# Altium PCB PCB_MAGNIS-v1.PcbDoc
Units mm, origin at the board's own origin, x right, y up, seen from the top; angles counter-clockwise.
Board outline 100 x 100 mm, 2 copper layers (Top Layer, Bottom Layer), stack 1.601 mm thick; 50 components, 32 nets, 198 pads, 70 vias.
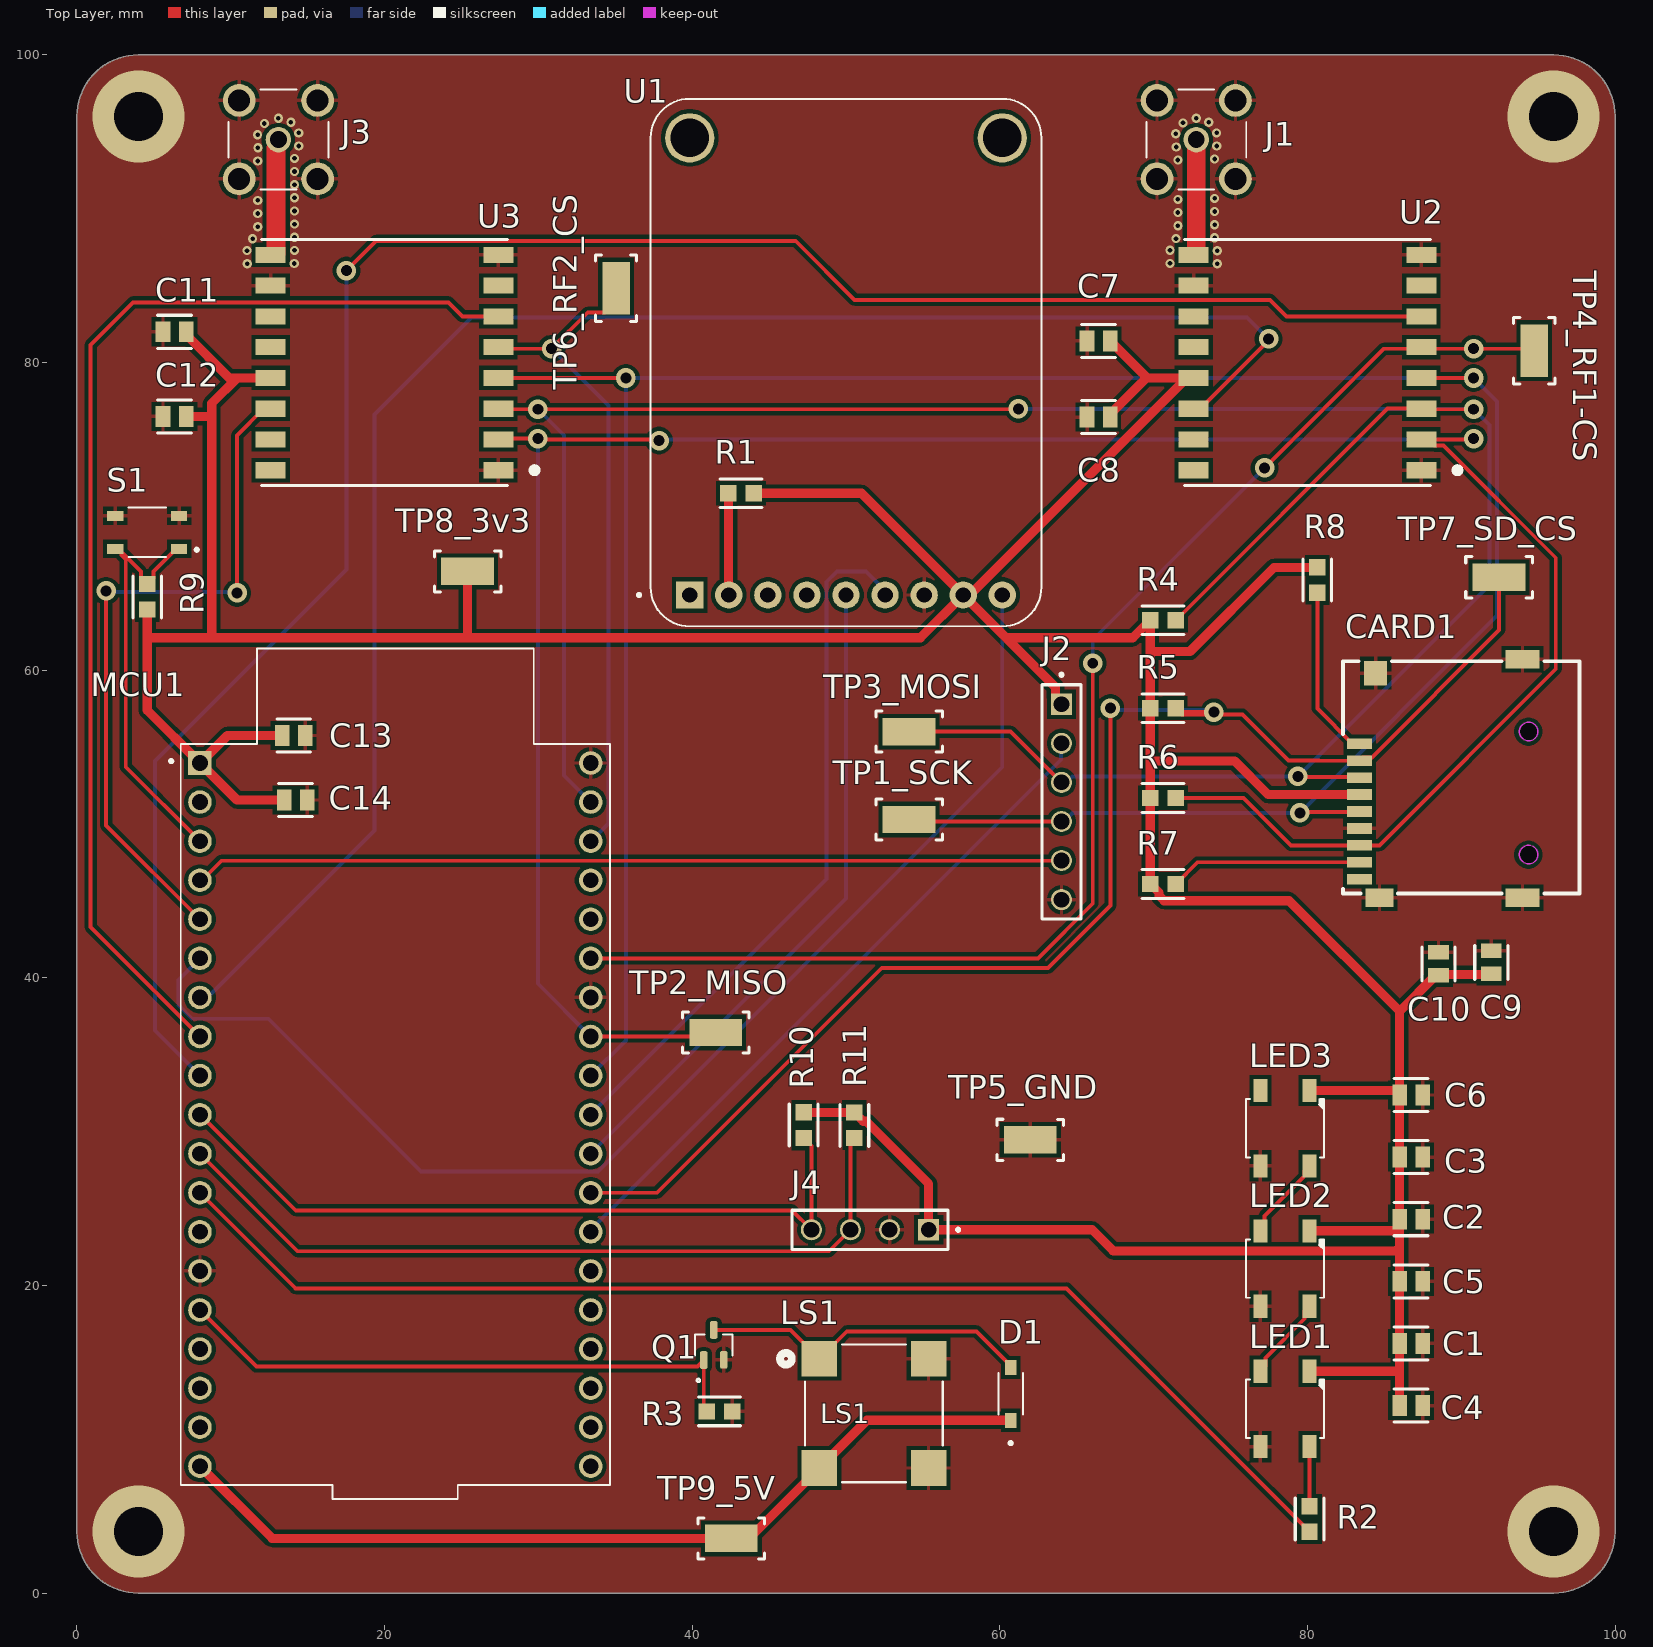
[diagram p0: Top Layer view]
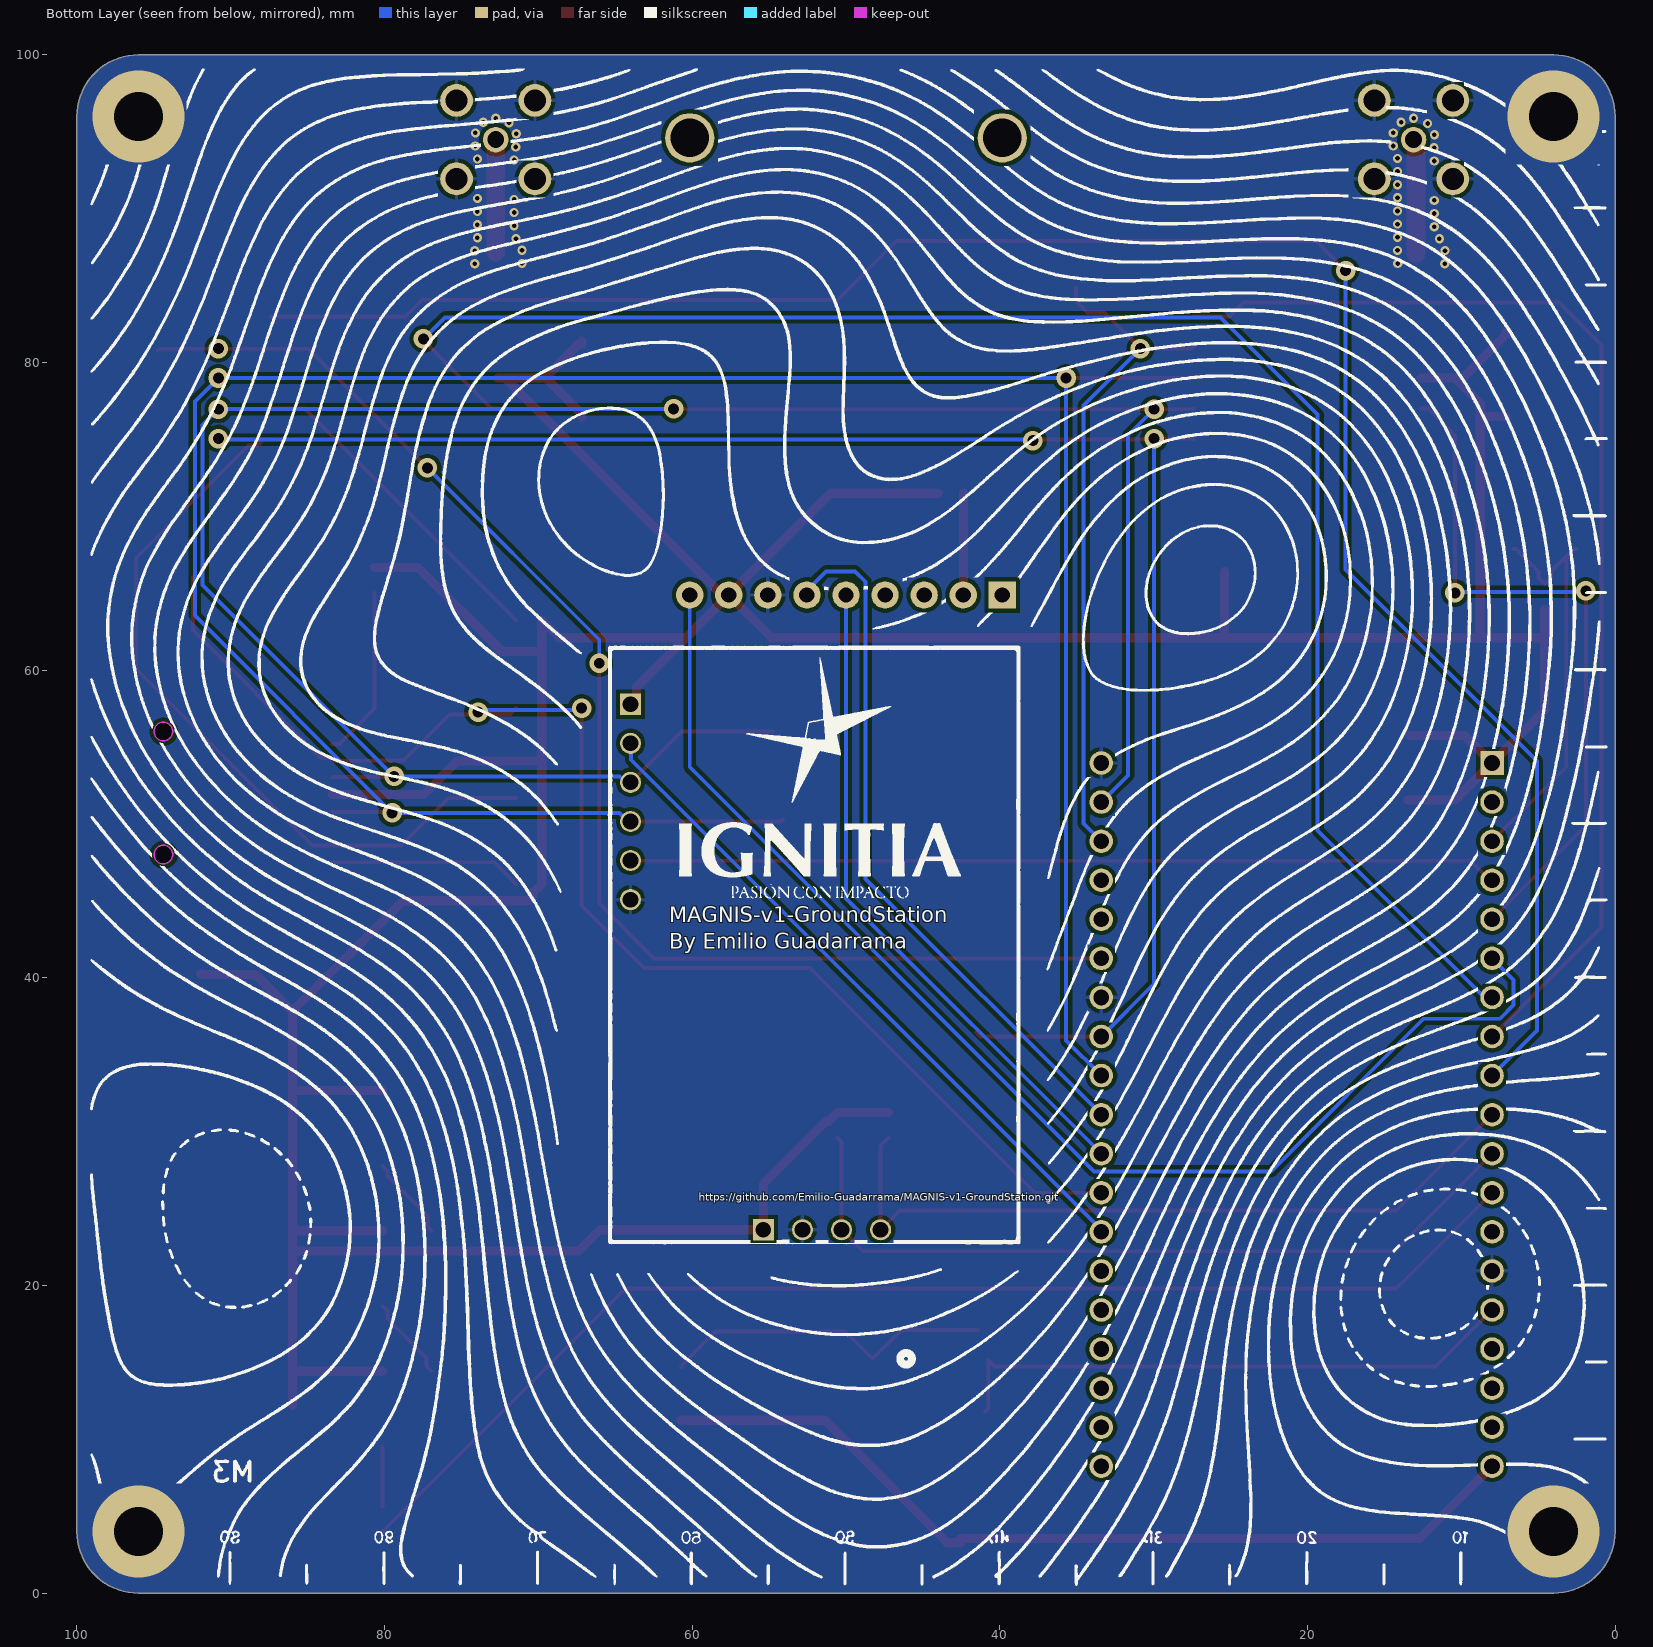
[diagram p1: Bottom Layer view, seen from below]
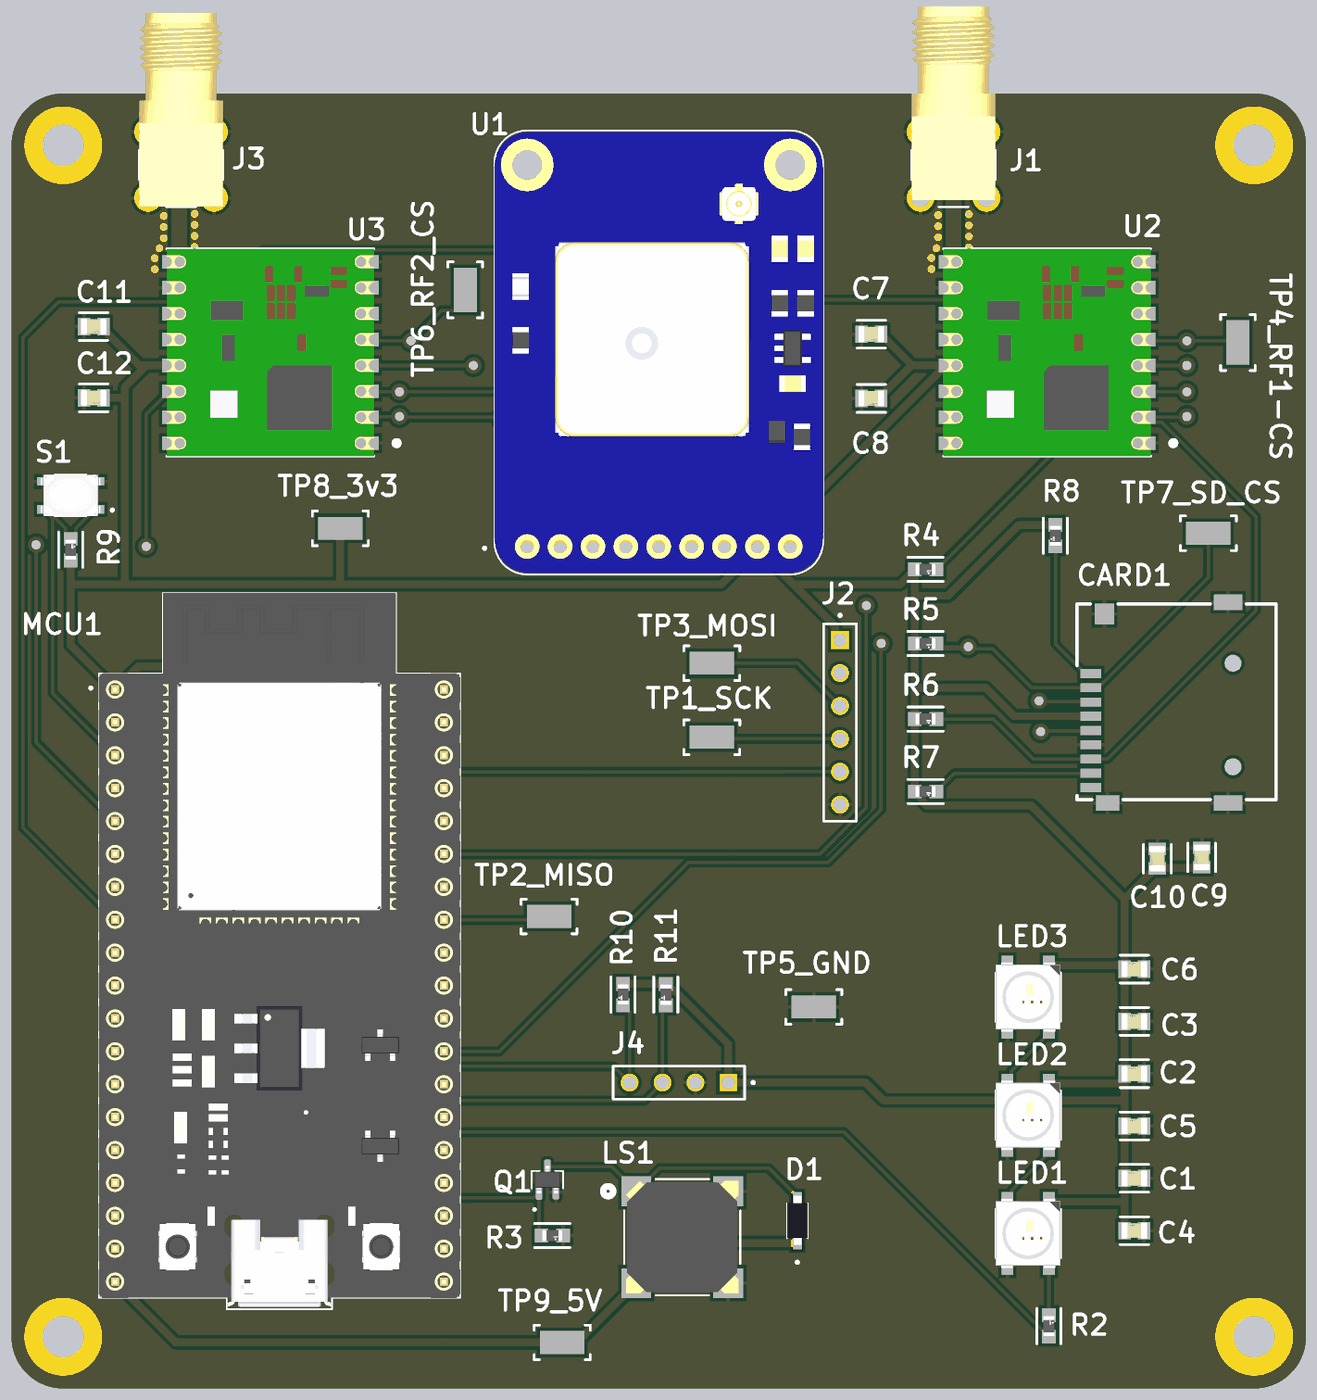
[diagram p2: 3D render of the assembled board from above, using the file's embedded part models]

## Layer stack, top to bottom
Top Solder: solder mask 0.0102, Solder Resist, Dk 3.5
Top Layer: signal copper 0.0356
Dielectric 1: dielectric 1.53, FR-4, Dk 4.5
Bottom Layer: signal copper 0.0356
Bottom Solder: solder mask 0.0102, Solder Resist, Dk 3.5

## Board outline
0,4 0,96 cw(c4,96) 4,100 96,100 cw(c96,96) 100,96 100,4 cw(c96,4) 96,0 4,0 cw(c4,4)

## Design rules (kind name [scope] priority, off if disabled: settings)
Clearance Clearance_1 [InNet('NetJ1_1') Or InNet('NetJ3_1') vs InNet('GND')] p1: gap=0.254 ignorepadtopadclearanceinfootprint=FALSE
Clearance [All] p2: gap=0.254 ignorepadtopadclearanceinfootprint=FALSE
PolygonConnect PolygonConnect_GND_Vias_Direct. [IsVia And InNet('GND')] p1: connectstyle=Direct reliefconductorwidth=0.254 reliefentries=4 polygonreliefangle="90 Angle" airgapwidth=0.254
PolygonConnect [All] p2: connectstyle=Relief reliefconductorwidth=0.254 reliefentries=4 polygonreliefangle="90 Angle" airgapwidth=0.254
RoutingVias [All] p1: holewidth=0.711 width=1.27 viastyle="Through Hole" minholewidth=0.711 minwidth=1.27 maxholewidth=0.711 maxwidth=1.27
SilkToSolderMaskClearance [IsPad] p1: minsilkscreentomaskgap=0.15 clearancetoexposedcopper=TRUE
SolderMaskExpansion [All] p1: expansion=0 istentingtop=FALSE
SupplyNets "Schematic Supply Nets_2" [InNet('VCC_3V3')] p1: voltage=0.000
SupplyNets "Schematic Supply Nets_1" [InNet('VCC_5V')] p2: voltage=0.000
SupplyNets "Schematic Supply Nets" [InNet('GND')] p3: voltage=0.000
Width RF_50Ohm_Width [InNet('NetJ1_1') Or InNet('NetJ3_1')] p1: maxlimit=1.229 minlimit=1.229 preferedwidth=1.229 impedanceprofiledriven=TRUE impedanceprofileid={5FBB7398-2BA2-489B-BA80-AC7F32F7AB72} impedanceprofilevalue=50.000000 minimp=50.000000 maximp=50.000000 favimp=50.000000
Width [All] p2: maxlimit=0.6 minlimit=0.1 preferedwidth=0.254 minimp=50.000000 maximp=50.000000 favimp=50.000000
29 further rules are at their usual default settings.

## Components (designator, comment, footprint, x,y, rotation, side; value= is the part's Value field where it differs from the comment)
C1 "100nF" FP-C0805C-DN-MFG 86.741,16.231 r0 top value="0.10 μF"
C2 "100nF" FP-C0805C-DN-MFG 86.741,24.308 r0 top value="0.10 μF"
C3 "100nF" FP-C0805C-DN-MFG 86.741,28.346 r0 top value="0.10 μF"
C4 "10uF" FP-C0805C-DN-MFG 86.741,12.192 r0 top value="0.10 μF"
C5 "10uF" FP-C0805C-DN-MFG 86.741,20.269 r0 top value="0.10 μF"
C6 "10uF" FP-C0805C-DN-MFG 86.741,32.385 r0 top value="0.10 μF"
C7 "100nF" FP-C0805C-DN-MFG 66.421,81.407 r180 top value="0.10 μF"
C8 "10uF" FP-C0805C-DN-MFG 66.421,76.454 r180 top value="0.10 μF"
C9 "100nF" FP-C0805C-DN-MFG 91.948,41.009 r90 top value="0.10 μF"
C10 "22uF" FP-C0805C-DN-MFG 88.519,40.906 r90 top value="0.10 μF"
C11 "100nF" FP-C0805C-DN-MFG 6.35,82 r180 top value="0.10 μF"
C12 "10uF" FP-C0805C-DN-MFG 6.35,76.5 r180 top value="0.10 μF"
C13 "100nF" FP-C0805C-DN-MFG 14.097,55.753 r0 top value="0.10 μF"
C14 "22uF" FP-C0805C-DN-MFG 14.224,51.562 r0 top value="0.10 μF"
CARD1 "thd2528-11sd-gf" PCBComponent_1 93.047,52.994 r90 top
D1 "1N4148W" SODFL3816X120N 60.706,12.954 r90 top
J1 "BWSMA-KE-Z001" BAT_WIRELESS_BWSMA-KE-Z001 72.771,94.488 r180 top
J2 "TSW-106-07-S-S-LL" SAMTEC_TSW-106-07-S-S-LL 64.008,57.785 r270 top
J3 "BWSMA-KE-Z001" BAT_WIRELESS_BWSMA-KE-Z001 13.1,94.488 r180 top
J4 "TSW-104-07-S-S-LL" SAMTEC_TSW-104-07-S-S-LL 55.372,23.622 r180 top
LED1 "WS2812B" *LED3535 78.537,11.975 r270 top
LED2 "WS2812B" *LED3535 78.537,21.1 r270 top
LED3 "WS2812B" *LED3535 78.537,30.226 r270 top
LS1 "MLT-8530" MLT-8530_JHE 51.816,11.684 r0 top
MCU1 "ESP32-DEVKITC" MODULE_ESP32-DEVKITC 20.701,31.115 r0 top
Q1 "NTS4001NT1G" SOT65P220X100-3N 41.402,16.129 r90 top
R1 "4k7" FP-MCT0603-IPC_A 43.18,71.501 r180 top
R2 "33" FP-MCT0603-IPC_A 80.137,4.826 r90 top
R3 "10k" FP-MCT0603-IPC_A 41.783,11.811 r0 top
R4 "10k" FP-MCT0603-IPC_A 70.612,63.246 r0 top
R5 "10k" FP-MCT0603-IPC_A 70.612,57.531 r0 top
R6 "10k" FP-MCT0603-IPC_A 70.612,51.689 r0 top
R7 "10k" FP-MCT0603-IPC_A 70.612,46.101 r0 top
R8 "10k" FP-MCT0603-IPC_A 80.645,65.853 r270 top
R9 "10k" FP-MCT0603-IPC_A 4.572,64.77 r90 top
R10 "4k7" FP-MCT0603-IPC_A 47.244,30.42 r270 top
R11 "4k7" FP-MCT0603-IPC_A 50.546,30.413 r270 top
S1 "SKRPABE010" SW_SKRPABE010 4.572,68.961 r180 top
TP1_SCK "5015" FP-5015-MFG 54.102,50.292 r0 top (schematic designator TP1)
TP2_MISO "5015" FP-5015-MFG 41.529,36.449 r0 top (schematic designator TP2)
TP3_MOSI "5015" FP-5015-MFG 54.102,56.007 r0 top (schematic designator TP3)
TP4_RF1-CS "5015" FP-5015-MFG 94.742,80.772 r270 top (schematic designator TP4)
TP5_GND "5015" FP-5015-MFG 61.976,29.464 r0 top (schematic designator TP5)
TP6_RF2_CS "5015" FP-5015-MFG 35.052,84.836 r90 top (schematic designator TP6)
TP7_SD_CS "5015" FP-5015-MFG 92.456,66.04 r0 top (schematic designator TP7)
TP8_3v3 "5015" FP-5015-MFG 25.4,66.421 r0 top (schematic designator TP8)
TP9_5V "5015" FP-5015-MFG 42.545,3.556 r0 top (schematic designator TP9)
U1 "746" XCVR_746 50,80 r0 top
U2 "RFM95W" XCVR_RFM95W-868S2 80,80 r180 top
U3 "RFM95W" XCVR_RFM95W-868S2 20,80 r180 top

## Footprints (in the part's own frame and the unit in brackets; to place one, negate y for a bottom-side part, rotate by r counter-clockwise, add the part's x,y. Pads: shape width x height; smd on the part's side, far side on the other; paste and mask are expansions set on the pad)
*LED3535 [mm]
  rect 1.5x0.9 smd: 1(-2.45,1.6) 2(-2.45,-1.6) 3(2.45,-1.6) 4(2.45,1.6)
  silkscreen extent -1.9,-2.54 1.9,2.54, body extent -2.7,-2.5 2.7,2.5, height 1.49
BAT_WIRELESS_BWSMA-KE-Z001 [mm]
  round 1.65 hole 1.1: 1(0,0)
  round 2.13 hole 1.42: 2_1(-2.55,2.55) 2_2(2.55,2.55) 2_3(2.55,-2.55) 2_4(-2.55,-2.55)
  silkscreen extent -3.25,-3.25 3.25,3.25, body extent -3.23,-12.24 3.23,2.72, height 9.75
FP-5015-MFG [mm]
  rect 3.43x1.78 smd paste+0 mask+0: 1(0,0)
  silkscreen extent -2.16,-1.34 2.17,1.34
FP-C0805C-DN-MFG [mm]
  rect 0.95x1.35 smd paste+0 mask+0: 1(-0.75,0) 2(0.75,0)
  silkscreen extent -1.1,-1.07 1.1,1.07, body extent -1.4,-0.85 1.4,0.85, height 0.25
FP-MCT0603-IPC_A [mm]
  rect 1.064x1.062 smd paste+0 mask+0: 1(-0.829,0) 2(0.829,0)
  silkscreen extent -1.36,-0.93 1.36,0.93, body extent -1.86,-1.03 1.86,1.03, height 0.25
MLT-8530_JHE [mm]
  rect 2.311x2.311 smd paste+0 mask+0: 1(-3.55,3.55) 2(-3.55,-3.55) 3(3.55,3.55) 4(3.55,-3.55)
  silkscreen extent -6.1,-4.48 4.48,4.48, body extent -4.35,-4.35 4.35,4.35, height 3
MODULE_ESP32-DEVKITC [mm]
  rect 1.53x1.53 / inner round 1.53 / far side rect 1.53x1.53 hole 1.02: 1(-12.7,22.85)
  round 1.53 hole 1.02: 2(-12.7,20.31) 3(-12.7,17.77) 4(-12.7,15.23) 5(-12.7,12.69) 6(-12.7,10.15) 7(-12.7,7.61) 8(-12.7,5.07) 9(-12.7,2.53) 10(-12.7,-0.01) 11(-12.7,-2.55) 12(-12.7,-5.09) 13(-12.7,-7.63) 14(-12.7,-10.17) 15(-12.7,-12.71) 16(-12.7,-15.25) 17(-12.7,-17.79) 18(-12.7,-20.33) 19(-12.7,-22.87) 20(12.7,-22.87) 21(12.7,-20.33) 22(12.7,-17.79) 23(12.7,-15.25) 24(12.7,-12.71) 25(12.7,-10.17) 26(12.7,-7.63) 27(12.7,-5.09) 28(12.7,-2.55) 29(12.7,-0.01) 30(12.7,2.53) 31(12.7,5.07) 32(12.7,7.61) 33(12.7,10.15) 34(12.7,12.69) 35(12.7,15.23) 36(12.7,17.77) 37(12.7,20.31) 38(12.7,22.85)
  silkscreen extent -14.67,-25 13.95,30.3, body extent -13.97,-24.8 13.97,30.3, height 6.69
PCBComponent_1 [mm]
  rect 0.7x1.6 smd: 1(2.218,9.667) 2(1.118,9.667) 3(0.018,9.667) 4(-1.082,9.667) 5(-2.182,9.667) 6(-3.282,9.667) 7(-4.382,9.667) 8(-5.482,9.667) 9(-6.582,9.667)
  rect 1.2x1.8 smd: 10(-7.782,8.367)
  rect 1.2x2.2 smd: 11(-7.782,-0.933) 12(7.718,-0.933)
  rect 1.6x1.5 smd: 13(6.818,8.616)
  Keep-Out Layer board cut-out: -4.382,-1.333 -4.441,-1.594 -4.608,-1.803 -4.848,-1.918 -5.115,-1.918 -5.356,-1.803 -5.522,-1.594 -5.582,-1.333 -5.582,-1.333 -5.522,-1.073 -5.356,-0.864 -5.115,-0.749 -4.848,-0.749 -4.608,-0.864 -4.441,-1.073 -4.382,-1.333
  Keep-Out Layer board cut-out: 3.618,-1.333 3.559,-1.594 3.392,-1.803 3.152,-1.918 2.885,-1.918 2.644,-1.803 2.477,-1.594 2.418,-1.333 2.418,-1.333 2.477,-1.073 2.644,-0.864 2.885,-0.749 3.152,-0.749 3.392,-0.864 3.559,-1.073 3.618,-1.333
  Keep-Out Layer circle w0.003: c-4.982,-1.333 r0.6
  Keep-Out Layer circle w0.003: c3.018,-1.333 r0.6
  Keep-Out Layer region: -4.382,-1.333 -4.441,-1.594 -4.608,-1.803 -4.848,-1.918 -5.115,-1.918 -5.356,-1.803 -5.522,-1.594 -5.582,-1.333 -5.582,-1.333 -5.522,-1.073 -5.356,-0.864 -5.115,-0.749 -4.848,-0.749 -4.608,-0.864 -4.441,-1.073 -4.382,-1.333
  Keep-Out Layer region: 3.618,-1.333 3.559,-1.594 3.392,-1.803 3.152,-1.918 2.885,-1.918 2.644,-1.803 2.477,-1.594 2.418,-1.333 2.418,-1.333 2.477,-1.073 2.644,-0.864 2.885,-0.749 3.152,-0.749 3.392,-0.864 3.559,-1.073 3.618,-1.333
  Keep-Out Layer region: -4.382,-1.333 -4.391,-1.438 -4.418,-1.539 -4.462,-1.633 -4.522,-1.719 -4.596,-1.793 -4.682,-1.853 -4.777,-1.897 -4.878,-1.924 -4.982,-1.933 -5.086,-1.924 -5.187,-1.897 -5.282,-1.853 -5.368,-1.793 -5.442,-1.719 -5.502,-1.633 -5.546,-1.539 -5.573,-1.438 -5.582,-1.333 -5.573,-1.229 -5.546,-1.128 -5.502,-1.033 -5.442,-0.948 -5.368,-0.874 -5.282,-0.814 -5.187,-0.77 -5.086,-0.743 -4.982,-0.733 -4.878,-0.743 -4.777,-0.77 -4.682,-0.814 -4.596,-0.874 -4.522,-0.948 -4.462,-1.033 -4.418,-1.128 -4.391,-1.229 -4.382,-1.333
  Keep-Out Layer region: 3.618,-1.333 3.609,-1.438 3.582,-1.539 3.538,-1.633 3.478,-1.719 3.404,-1.793 3.318,-1.853 3.223,-1.897 3.122,-1.924 3.018,-1.933 2.914,-1.924 2.813,-1.897 2.718,-1.853 2.632,-1.793 2.558,-1.719 2.498,-1.633 2.454,-1.539 2.427,-1.438 2.418,-1.333 2.427,-1.229 2.454,-1.128 2.498,-1.033 2.558,-0.948 2.632,-0.874 2.718,-0.814 2.813,-0.77 2.914,-0.743 3.018,-0.733 3.122,-0.743 3.223,-0.77 3.318,-0.814 3.404,-0.874 3.478,-0.948 3.538,-1.033 3.582,-1.128 3.609,-1.229 3.618,-1.333
  silkscreen extent -7.53,-4.64 7.59,10.73
SAMTEC_TSW-104-07-S-S-LL [mm]
  rect 1.37x1.37 hole 1.02: 01(0,0)
  round 1.37 hole 1.02: 02(2.54,0) 03(5.08,0) 04(7.62,0)
  silkscreen extent -2.02,-1.27 8.89,1.27
SAMTEC_TSW-106-07-S-S-LL [mm]
  rect 1.37x1.37 hole 1.02: 01(0,0)
  round 1.37 hole 1.02: 02(2.54,0) 03(5.08,0) 04(7.62,0) 05(10.16,0) 06(12.7,0)
  silkscreen extent -2.02,-1.27 13.97,1.27
SODFL3816X120N [mm]
  rect 0.97x0.73 smd paste+0 mask+0.102: A(1.72,0) C(-1.72,0)
  silkscreen extent -3.3,-0.8 1.35,0.8, body extent -1.87,-0.81 1.93,0.79, height 1.1
SOT65P220X100-3N [mm]
  rrect50% 1.15x0.5 smd: 1(-0.98,0.65) 2(-0.96,-0.65) 3(0.98,0)
  silkscreen extent -2.4,-1.21 0.68,1.21, body extent -1.05,-1 1.05,1, height 1.1
SW_SKRPABE010 [mm]
  rect 1.05x0.65 smd: 1(-2.075,1.075) 2(2.075,1.075) 3(-2.075,-1.075) 4(2.075,-1.075)
  silkscreen extent -3.32,-1.6 1.23,1.6, body extent -2.3,-1.6 2.3,1.6, height 2.5
XCVR_746 [mil]
  rect 70x70 / inner round 70 / far side rect 70x70 hole 39.37 mask+4.02: 1(-400,-595)
  round 70 hole 39.37 mask+4.02: 2(-300,-595) 3(-200,-595) 4(-100,-595) 5(0,-595) 6(100,-595) 7(200,-595) 8(300,-595) 9(400,-595)
  round 125.98 hole 98.43 mask+4.02: SH1(-400,575) SH2(400,575)
  silkscreen extent -533,-675 500,675, body extent -500,-670 500,670, height 256
XCVR_RFM95W-868S2 [mm]
  rect 1.95x1.05 smd: 1(-7.4,7) 2(-7.4,5) 3(-7.4,3) 4(-7.4,1) 5(-7.4,-1) 6(-7.4,-3) 7(-7.4,-5) 8(-7.4,-7) 9(7.4,-7) 10(7.4,-5) 11(7.4,-3) 12(7.4,-1) 13(7.4,1) 14(7.4,3) 15(7.4,5) 16(7.4,7)
  silkscreen extent -10.04,-8 8,8, body extent -8,-8 8,8, height 1.8

## Part data
C1 C2 C3 C4 C5 C6 C7 C8 C9 C10 C11 C12 C13 C14: library part CMP-2007-00279-2, "CAP CER 0.1UF 50V X7R 0805", Capacitance="0.10 μF", Manufacturer=KEMET, Manufacturer Part Number=C0805C104K5RACTU, Package=C0805C-DN, Temperature="-55°C to +125°C", Temperature Characteristic=X7R, Temperature Coefficient=30ppm/°C, Temperature Range High=+125°C, Temperature Range Low=-55°C, Tolerance=0.1, Voltage Rating="50 V", Automotive=No, Category=Cap, ComponentLink2Description=Datasheet, ComponentLink2URL=https://content.kemet.com/datasheets/KEM_C1003_C0G_SMD.pdf, Device Class L1="Passive Components", Device Class L2=Capacitors, Device Class L3="Ceramic Capacitors", Digikey Description="CAP CER 0.1UF 50V X7R 0805", Height=0.88mm, Ipc Land Pattern Name=CAPC200125X78, Lead Free=Yes, Material=Ceramic, Mouser Description="Cap Ceramic 0.1uF 50V X7R 10% SMD 2.0 x 1.2 mm 125 C Paper T/R", Octopart=https://octopart.com/c0805c104k5ractu-kemet-143926, RoHS=TRUE
CARD1: "Card Connection Mode:Push-Push Card Type:MicroSD Card (TF Card) Connector Type:Connector and Ejector Additional Card Detection Pins:No Height Above Board:2mm Operating Temperature:- Operating Temperature:-", JLCPCB Part Class="Extended Part", LCSC Part Name="自弹式 MicroSD卡(TF卡) 卡座", Manufacturer=THD(台华达), Manufacturer Part=THD2528-11SD-GF, Operating Temperature=-, AddInBom=yes, Additional Card Detection Pins=No, Card Connection Mode=Push-Push, Card Type="MicroSD Card (TF Card)", Connector Type="Connector and Ejector", ConvertToPcb=yes, Datasheet=https://item.szlcsc.com/datasheet/THD2528-11SD-GF/268992.html, FootprintName=TF-SMD_THD2528-11SD-GF, Height Above Board=2mm, ModelId=1386afa97a0040b3a0d9dc55a27a422f, ModelName=TF-SMD_THD2528-11SD-GF, ModelTransform=635.826,598.424,0,0,0,0,0,-82.677,-23.622, Supplier=LCSC, Supplier Footprint=SMD, Supplier Part=C283232, Symbol=THD2528-11SD-GF
D1: "Small Signal Diode, SOD-123F, 100V, 0.15A, 150Â°C", Package="SOD-123F Diotec", Check_prices=https://www.snapeda.com/parts/1N4148W/Diotec/view-part/?ref=eda, MF="Diotec Semiconductor", MP=1N4148W, SnapEDA_Link=https://www.snapeda.com/parts/1N4148W/Diotec/view-part/?ref=snap
J1 J3: "1 Inner bore SMA Board Edge Positive foot -65â„ƒ~+165â„ƒ 50Î© Plugin RF Connectors / Coaxial Connectors ROHS", Package=None, Check_prices=https://www.snapeda.com/parts/BWSMA-KE-Z001/Bat+Wireless/view-part/?ref=eda, MF="Bat Wireless", MP=BWSMA-KE-Z001, SnapEDA_Link=https://www.snapeda.com/parts/BWSMA-KE-Z001/Bat+Wireless/view-part/?ref=snap
J2 J4: Package=None, Availability=Unavailable, Price=None
  J2: MP=TSW-106-07-S-S-LL
  J4: MP=TSW-104-07-S-S-LL
LED1 LED2 LED3: "Intelligent control LED integrated light source", Package=None, Check_prices=https://www.snapeda.com/parts/WS2812B/Worldsemi/view-part/?ref=eda, MF=Worldsemi, MP=WS2812B, SnapEDA_Link=https://www.snapeda.com/parts/WS2812B/Worldsemi/view-part/?ref=snap
LS1: "Description", Manufacturer_Name="Jiangsu Huaneng Elec", Copyright="Copyright (C) 2025 Ultra Librarian. All rights reserved.", Manufacturer_Part_Number=MLT-8530, RefDes=RefDes, Type=Type
MCU1: "ESP32-WROOM-32UE series Transceiver; 802.11 b/g/n (Wi-Fi, WiFi, WLAN), Bluetooth Â® Smart Ready 4.x Dual Mode Evaluation Board", Package=None, Check_prices=https://www.snapeda.com/parts/ESP32-DEVKITC/Espressif+Systems/view-part/?ref=eda, MF="Espressif Systems", MP=ESP32-DEVKITC, SnapEDA_Link=https://www.snapeda.com/parts/ESP32-DEVKITC/Espressif+Systems/view-part/?ref=snap
Q1: "N-Channel 30V 270mA _Ta_ 330mW _Ta_ Surface Mount SC-70-3 _SOT323_", Package="SC-70 ON Semiconductor", Availability=Unavailable, MF="ON Semiconductor", MP=NTS4001NT1G, Price=None, SnapEDA_Link=https://www.snapeda.com/parts/NTS4001NT1G/ON%20Semiconductor/view-part/274588/?ref=snap
R1 R2 R3 R4 R5 R6 R7 R8 R9 R10 R11: library part CMP-02407-011165-1, "RES SMD 100 OHM 1% 1/8W 0603", Case Code (Imperial)=0603, Case Code (Metric)=1608, Max Operating Temperature=155°C, Max Power Dissipation=125mW, Min Operating Temperature=-55°C, Package Quantity=1000, Resistance=20kR, Resistor Type="Thin Film", Temperature Coefficient=25ppm/°C, Tolerance=0.1%, Voltage Rating=75V, Case/Package=0603, Construction=Rectangular, Depth=0.85mm, Features="Automotive AEC-Q200", Height=0.022inch, Length=1.55mm, Military Standard=Not, Number of Terminations=2, Packaging="Tape and Reel", Power Rating=125mW, Series="MCT 0603 - Precision", Termination=SMD/SMT, Weight=6.7E-05oz, Width=0.033inch
S1: "Switch Tactile N.O. SPST Button J-Bend 0.05A 16VDC 1.57N SMD Automotive T/R", Package=None, Check_prices=https://www.snapeda.com/parts/SKRPABE010/ALPS/view-part/?ref=eda, MF=ALPS, MP=SKRPABE010, SnapEDA_Link=https://www.snapeda.com/parts/SKRPABE010/ALPS/view-part/?ref=snap
TP1_SCK TP2_MISO TP3_MOSI TP4_RF1-CS TP5_GND TP6_RF2_CS TP7_SD_CS TP8_3v3 TP9_5V: library part CMP-2000-05183-2, "PC TEST POINT MINIATURE", Manufacturer=keystone, Automotive=No, Category=Conn, ComponentLink2Description=Datasheet, ComponentLink2URL=http://www.keyelco.com/product-pdf.cfm?p=1353, Conn Orientation=Straight, Contact Material=Silver, Device Class L1=Connectors, Device Class L2=unset, Device Class L3=unset, Digikey Description="PC TEST POINT MINIATURE", Height=1.65mm, Lead Free=Yes, Manufacturer Part Number=5015, Number Of Contacts=1, Octopart=https://octopart.com/5015-keystone-3822, Package=5015, RoHS=TRUE
U1: "Ultimate GPS Breakout, 66 channel, 10 Hz updates, 5 V, -165 dBm, MTK3339 Chipset", Package="NON STANDARD-11 Adafruit", Check_prices=https://www.snapeda.com/parts/746/Adafruit+Industries/view-part/?ref=eda, MF="Adafruit Industries", MP=746, SnapEDA_Link=https://www.snapeda.com/parts/746/Adafruit+Industries/view-part/?ref=snap
U2 U3: library part RFM95W-868S2, "General ISM < 1GHz LoRaâ„¢ Transceiver Module 868MHz Antenna Not Included Surface Mount", Package="Non Standard RF Solutions", Availability="In Stock", Check_prices=https://www.snapeda.com/parts/RFM95W-868S2/RF+Solutions/view-part/?ref=eda, MF=RF, MP=RFM95W-868S2, Price=None, Purchase-URL=https://pricing.snapeda.com/search?q=RFM95W-868S2&ref=eda, SnapEDA_Link=https://www.snapeda.com/parts/RFM95W-868S2/RF+Solutions/view-part/?ref=snap

## Via types
v1: diameter 0.6, hole 0.3, Top Layer to Bottom Layer, 44 vias
v2: diameter 1.27, hole 0.711, Top Layer to Bottom Layer, tented both sides, 20 vias
v3: diameter 6, hole 3.2, Top Layer to Bottom Layer, 4 vias
v4: diameter 1.3, hole 1.3, Top Layer to Bottom Layer, 2 vias

## Nets (pads, with @x,y where several pads share a name; then routed paths per layer and width w, separated by ;. In a path a pad name is that pad's centre, name@x,y a point inside that pad or via, vN(x,y) a via of type N, cw(c..) or ccw(c..) an arc to the next point about the centre after c; other vN are vias at no path point)
BTN: MCU1.3 R9.2 S1.1 S1.2 | length 27.9
  Top Layer w0.254: S1.1 6.447,67.886 4.976,66.415 4.976,66.003 R9.2 4.168,66.003 4.168,66.415 S1.2@2.697,67.886 ; MCU1.3 3.175,53.711 3.175,67.208 2.895,67.488 2.895,67.688 S1.2@2.697,67.886 ; S1.2@2.697,67.886 S1.2 S1.2@2.697,67.886
BUZZER: MCU1.15 Q1.1 R3.1 | length 37.9
  Top Layer w0.254: MCU1.15 11.6,14.806 11.674,14.732 33.229,14.732 ccw(c33.401,15.865) 33.403,14.719 40.335,14.732 Q1.1 40.752,12.013 R3.1
DAT1: CARD1.8 R7.2 | length 12.5
  Top Layer w0.254: R7.2 72.853,47.512 CARD1.8
DAT2: CARD1.1 R8.2 | length 11.2
  Top Layer w0.254: R8.2 80.645,57.497 82.93,55.212 CARD1.1
GND: C1.2 C2.2 C3.2 C4.2 C5.2 C6.2 C7.2 C8.2 C9.2 C10.2 C11.2 C12.2 C13.2 C14.2 CARD1.6 CARD1.10 CARD1.11 CARD1.12 CARD1.13 J1.2_1 J1.2_2 J1.2_3 J1.2_4 J2.06 J3.2_1 J3.2_2 J3.2_3 J3.2_4 J4.02 LED1.3 LED2.3 LED3.3 LS1.3 LS1.4 MCU1.14 MCU1.32 MCU1.38 Q1.2 R3.2 S1.3 S1.4 TP5_GND.1 U1.7 U2.1 U2.8 U2.10 U3.1 U3.8 U3.10
  other v1: 11.07,86.423 74.129,86.419 14.132,86.438 71.067,86.442 11.06,87.277 74.14,87.273 14.146,87.292 71.06,87.296 11.424,88.05 71.451,88.055 73.963,88.108 14.146,88.146 11.762,88.834 71.579,88.899 73.963,88.962 14.146,89 11.762,89.688 71.579,89.753 73.963,89.816 14.146,89.854 11.762,90.542 71.579,90.607 73.963,90.67 14.146,90.708 14.146,91.562 14.146,92.416 11.762,93.104 71.579,93.169 73.963,93.232 14.146,93.27 11.768,93.958 71.462,94.015 14.429,94.075 74.1,94.075 11.748,94.812 71.435,94.869 14.422,94.929 74.093,94.929 12.191,95.542 71.91,95.579 13.914,95.616 73.585,95.616 13.1,95.875 72.771,95.875
  other v3: 4,4 96,4 4,96 96,96
GPS_PPS: MCU1.6 U1.9 | length 83.7
  Bottom Layer w0.254: MCU1.6 6.604,39.868 6.604,38.227 7.493,37.338 12.446,37.338 22.365,27.419 33.876,27.419 60.16,53.703 U1.9
GPS_UART_RX: MCU1.29 U1.6 | length 45.9
  Bottom Layer w0.254: MCU1.29 48.73,46.434 48.73,65.748 49.403,66.421 51.308,66.421 52.54,65.189 U1.6
GPS_UART_TX: MCU1.28 U1.5 | length 43.2
  Bottom Layer w0.254: MCU1.28 50,45.164 U1.5
I2C_SCL: J4.03 MCU1.11 R11.2 | length 51.6
  Top Layer w0.254: MCU1.11 14.341,22.225 48.895,22.225 J4.03 50.292,29.329 R11.2
I2C_SDA: J4.04 MCU1.10 R10.2 | length 49
  Top Layer w0.254: MCU1.10 14.227,24.879 46.495,24.879 J4.04 47.752,29.082 R10.2
NetD1_A: D1.A LS1.1 Q1.3 | length 21.9
  Top Layer w0.254: Q1.3 46.391,17.109 LS1.1 50.05,17.018 58.482,17.018 60.706,14.794 D1.A
NetJ1_1: J1.1 U2.9 | length 7.3
  Top Layer w1.229: U2.9@72.771,87.171 J1.1
NetJ3_1: J3.1 U3.9 | length 6.8
  Top Layer w1.229: U3.9@12.954,87.09 J3.1@12.954,93.928
NetLED1_2: LED1.2 LED2.4 | length 5.6
  Top Layer w0.254: LED1.2 77.26,14.748 77.26,15.284 79.814,17.838 79.814,18.328 LED2.4
NetLED1_4: LED1.4 R2.2 | length 3.9
  Top Layer w0.254: R2.2 LED1.4
NetLED2_2: LED2.2 LED3.4 | length 5.6
  Top Layer w0.254: LED2.2 77.212,23.825 77.212,24.507 79.814,27.109 79.814,27.453 LED3.4
NetR1_2: R1.2 U1.2 | length 6.6
  Top Layer w0.6: R1.2 42.365,71.486 42.365,64.902 U1.2
RFM95W_CS: MCU1.33 TP4_RF1-CS.1 U2.5 | length 87.9
  Top Layer w0.254: MCU1.33 48.504,41.265 51.298,41.265 54.219,41.265 62.474,41.265 66.04,44.831 v2(66.04,60.452) ; v2(77.216,73.152) 84.963,80.899 v2(90.805,80.899) 94.615,80.899 TP4_RF1-CS.1
  Bottom Layer w0.254: v2(66.04,60.452) 66.04,61.976 v2(77.216,73.152)
RFM95W_CS_2: MCU1.36 TP6_RF2_CS.1 U3.5 | length 43.8
  Top Layer w0.254: U3.5 27.501,80.899 v2(30.861,80.899) 33.21,83.248 34.289,83.248 35.052,84.011 TP6_RF2_CS.1
  Bottom Layer w0.254: v2(30.861,80.899) 34.547,77.213 34.547,50.031 MCU1.36
RFM95W_INT: MCU1.7 U2.14 | length 111
  Top Layer w0.254: U2.14 73.05,77 77.47,81.42 v2(77.47,81.534)
  Bottom Layer w0.254: MCU1.7 8.245,38.969 8.743,38.969 19.343,49.569 19.343,76.62 25.654,82.931 76.073,82.931 v2(77.47,81.534)
RFM95W_INT_2: MCU1.5 U3.14 | length 45.6
  Top Layer w0.254: v2(1.905,65.151) 1.905,49.901 MCU1.5 ; v2(10.414,65.024) 10.414,75.264 12.15,77 U3.14
  Bottom Layer w0.254: v2(1.905,65.151) 1.968,65.087 10.351,65.087 v2(10.414,65.024)
RFM95W_RESET: MCU1.9 U2.6 | length 131.4
  Top Layer w0.254: v2(17.526,85.979) 19.453,87.906 46.73,87.906 50.562,84.074 77.565,84.074 78.639,83 U2.6
  Bottom Layer w0.254: MCU1.9 5.08,36.566 5.08,54.102 17.526,66.548 v2(17.526,85.979)
RFM95W_RESET_2: MCU1.8 U3.6 | length 75.9
  Top Layer w0.254: MCU1.8 0.889,43.297 0.889,81.153 3.642,83.906 24.171,83.906 25.077,83 U3.6
SD_CS: CARD1.2 MCU1.27 R5.2 TP7_SD_CS.1 | length 92.8
  Top Layer w0.254: MCU1.27 37.709,26.025 52.324,40.64 63.119,40.64 67.183,44.704 v2(67.183,57.531) ; R5.2 R5.2@71.695,57.277 ; v2(73.914,57.277) R5.2@71.695,57.277 ; TP7_SD_CS.1 92.456,62.599 84.192,54.335 83.603,54.335 CARD1.2 80.746,54.112 80.741,54.117 78.779,54.117 75.769,57.127 71.845,57.127 R5.2@71.695,57.277
  Bottom Layer w0.254: v2(67.183,57.531) 67.31,57.404 73.787,57.404 v2(73.914,57.277)
SD_CS_EXT: J2.02 MCU1.26 | length 44.4
  Bottom Layer w0.254: MCU1.26 33.401,23.606 63.974,54.179 63.974,55.211 J2.02
SD_MISO_EXT: J2.05 MCU1.4 | length 56.5
  Top Layer w0.254: MCU1.4 8.126,46.345 9.395,47.614 39.032,47.614 39.137,47.614 J2.05
SNS_SPI_MISO: CARD1.7 MCU1.31 R6.2 TP2_MISO.1 U2.2 U3.2 | length 164.8
  Top Layer w0.254: U3.2 27.457,75.057 v2(29.972,75.057) 30.035,74.993 37.782,74.993 v2(37.846,74.93) ; MCU1.31 41.265,36.185 TP2_MISO.1 ; R6.2 75.85,51.689 78.927,48.612 CARD1.7 84.68,48.612 96.139,60.071 96.139,67.31 88.847,74.602 88.248,74.602 88.068,74.782 U2.2@88.068,75 ; U2.2 U2.2@88.068,75 ; v2(90.805,75.057) 90.748,75 U2.2@88.068,75
  Bottom Layer w0.254: v2(29.972,75.057) 29.972,39.614 MCU1.31 ; v2(37.846,74.93) 37.91,74.993 90.742,74.993 v2(90.805,75.057)
SNS_SPI_MOSI: CARD1.3 J2.03 MCU1.37 R4.2 TP3_MOSI.1 U2.3 U3.3 | length 175.1
  Top Layer w0.254: U3.3 27.438,76.962 v2(29.972,76.962) 61.189,76.962 v2(61.211,76.984) ; TP3_MOSI.1@54.737,56.007 60.706,56.007 J2.03 ; R4.2 85.196,77 U2.3 87.438,76.962 v2(90.805,76.962) ; v2(79.375,53.101) 79.419,53.057 83.336,53.057 CARD1.3
  Bottom Layer w0.254: v2(29.972,76.962) 31.662,75.272 31.662,53.164 MCU1.37 ; v2(61.211,76.984) 61.222,76.973 90.794,76.973 v2(90.805,76.962) 91.821,75.946 91.821,65.547 v2(79.375,53.101) 64.706,53.101 64.31,52.705 J2.03
SNS_SPI_SCK: CARD1.5 J2.04 MCU1.30 TP1_SCK.1 U2.4 U3.4 | length 177.1
  Top Layer w0.254: U3.4 27.406,78.994 v2(35.687,78.994) ; TP1_SCK.1 54.229,50.165 J2.04 ; v2(79.502,50.723) 79.546,50.767 83.336,50.767 CARD1.5 ; U2.4 87.406,78.994 v2@90.932,78.994
  Bottom Layer w0.254: MCU1.30 35.687,35.931 v2(35.687,78.994) v2(90.805,78.994) 92.329,77.47 92.329,63.55 v2(79.502,50.723) 64.715,50.723 64.157,50.165 J2.04
VCC_3V3: C1.1 C2.1 C3.1 C4.1 C5.1 C6.1 C7.1 C8.1 C9.1 C10.1 C11.1 C12.1 C13.1 C14.1 CARD1.4 J2.01 J4.01 LED1.1 LED2.1 LED3.1 MCU1.1 R1.1 R4.1 R5.1 R6.1 R7.1 R8.1 R9.1 R10.1 R11.1 TP8_3v3.1 U1.8 U2.13 U3.13 | length 334.4
  Top Layer w0.6: R9.1 4.572,62.103 ; C12.1 8.682,76.5 8.763,76.581 ; C11.1 7.1,81.8 9.9,79 10.42,79 ; U3.13 10.42,79 ; C13.1 9.789,55.753 MCU1.1 ; C14.1 10.404,51.562 MCU1.1 ; TP8_3v3.1 25.4,62.103 ; R1.1 51.006,71.501 U1.8 ; R10.1 47.248,31.246 50.542,31.246 R11.1 ; R11.1 51.118,30.669 51.307,30.669 55.372,26.604 J4.01 65.999,23.622 67.374,22.247 85.759,22.247 85.991,22.479 ; J2.01 63.623,58.17 63.623,58.884 60.404,62.103 ; C8.1 67.171,76.654 69.517,79 69.578,79 ; C7.1 67.171,81.207 67.371,81.207 69.578,79 ; R4.1 68.639,62.103 60.404,62.103 ; R7.1 R6.1 69.783,54.102 ; R4.1 69.783,61.214 ; R7.1@69.783,46.101 70.356,45.529 70.356,45.34 70.68,45.016 78.803,45.016 85.991,37.828 ; U2.13 U2.13@72.15,79 ; LED1.1 85.777,14.425 85.991,14.211 ; LED2.1 85.935,23.551 85.991,23.495 ; LED3.1 85.816,32.676 85.991,32.501 C6.1 ; R8.1 77.833,66.683 72.364,61.214 69.783,61.214 ; CARD1.4 77.451,51.912 75.261,54.102 69.783,54.102 ; C4.1 85.991,14.211 ; C9.1 91.896,40.207 88.571,40.207 C10.1 88.319,40.156 85.991,37.828 ; 4.572,62.103 4.572,57.394 MCU1.1 ; 4.572,62.103 8.763,62.103 ; 8.763,62.103 8.763,76.581 ; 8.763,62.103 25.4,62.103 ; 8.763,76.581 8.763,77.343 10.42,79 ; 25.4,62.103 54.836,62.103 U1.8 ; U1.8 60.404,62.103 ; U1.8 57.845,65.112 58.262,65.112 U2.13@72.15,79 ; 69.578,79 U2.13@72.15,79 ; 69.783,54.102 R5.1 69.783,61.214 ; 85.991,14.211 C1.1 C5.1 85.991,22.479 ; 85.991,22.479 85.991,23.495 ; 85.991,23.495 C2.1 C3.1 C6.1 ; C6.1 85.991,37.828
VCC_5V: D1.C LS1.2 MCU1.19 TP9_5V.1 | length 57.9
  Top Layer w0.6: MCU1.19 12.69,3.556 TP9_5V.1 ; TP9_5V.1@42.545,3.28 43.412,3.28 51.366,11.234 D1.C
WS2812B_DATA: MCU1.12 R2.1 | length 81.3
  Top Layer w0.254: MCU1.12 14.14,19.886 14.214,19.812 33.229,19.812 ccw(c33.401,20.945) 33.401,19.799 64.322,19.812 64.397,19.738 R2.1@80.137,3.997
pads on no net: CARD1.9 LED3.2 MCU1.2 MCU1.13 MCU1.16 MCU1.17 MCU1.18 MCU1.20 MCU1.21 MCU1.22 MCU1.23 MCU1.24 MCU1.25 MCU1.34 MCU1.35 U1.1 U1.3 U1.4 U1.SH1 U1.SH2 U2.7 U2.11 U2.12 U2.15 U2.16 U3.7 U3.11 U3.12 U3.15 U3.16
copper on no net:
  other v4: 94.361,48.006 94.361,56.007

## Polygon pours and split planes (outlines as drawn)
GND on Top Layer "GND_L01_P000" (solid, pour order 0): 0,4 0,96 cw(c4,96) 4,100 96,100 cw(c96,96) 100,96 100,4 cw(c96,4) 96,0 4,0 cw(c4,4)
GND on Bottom Layer "GND_L02_P001" (solid, pour order 1): 0,4 0,96 cw(c4,96) 4,100 96,100 cw(c96,96) 100,96 100,4 cw(c96,4) 96,0 4,0 cw(c4,4)

## Silkscreen, mask and mechanical layers (free items; w line width, h text height)
Bottom Overlay:
  drawing of 310 lines, arcs and shapes, not listed
  text "MAGNIS-v1-GroundStation / By Emilio Guadarrama" at 61.496,41.529 h1.72
  text "https://github.com/Emilio-Guadarrama/MAGNIS-v1-GroundStation.git" at 59.563,25.494 h0.5